# Altium PCB Sampler_DIOT.PCBDOC (part 9 of 11)
Units mm, origin at the board's own origin, x right, y up, seen from the top; angles counter-clockwise.
Board outline 222.9 x 100 mm, 4 copper layers (L1, P2, L3, L4), stack 1.6 mm thick; 754 components, 442 nets, 2347 pads, 1230 vias.
Unrouted connection lines stored in the file: 10.
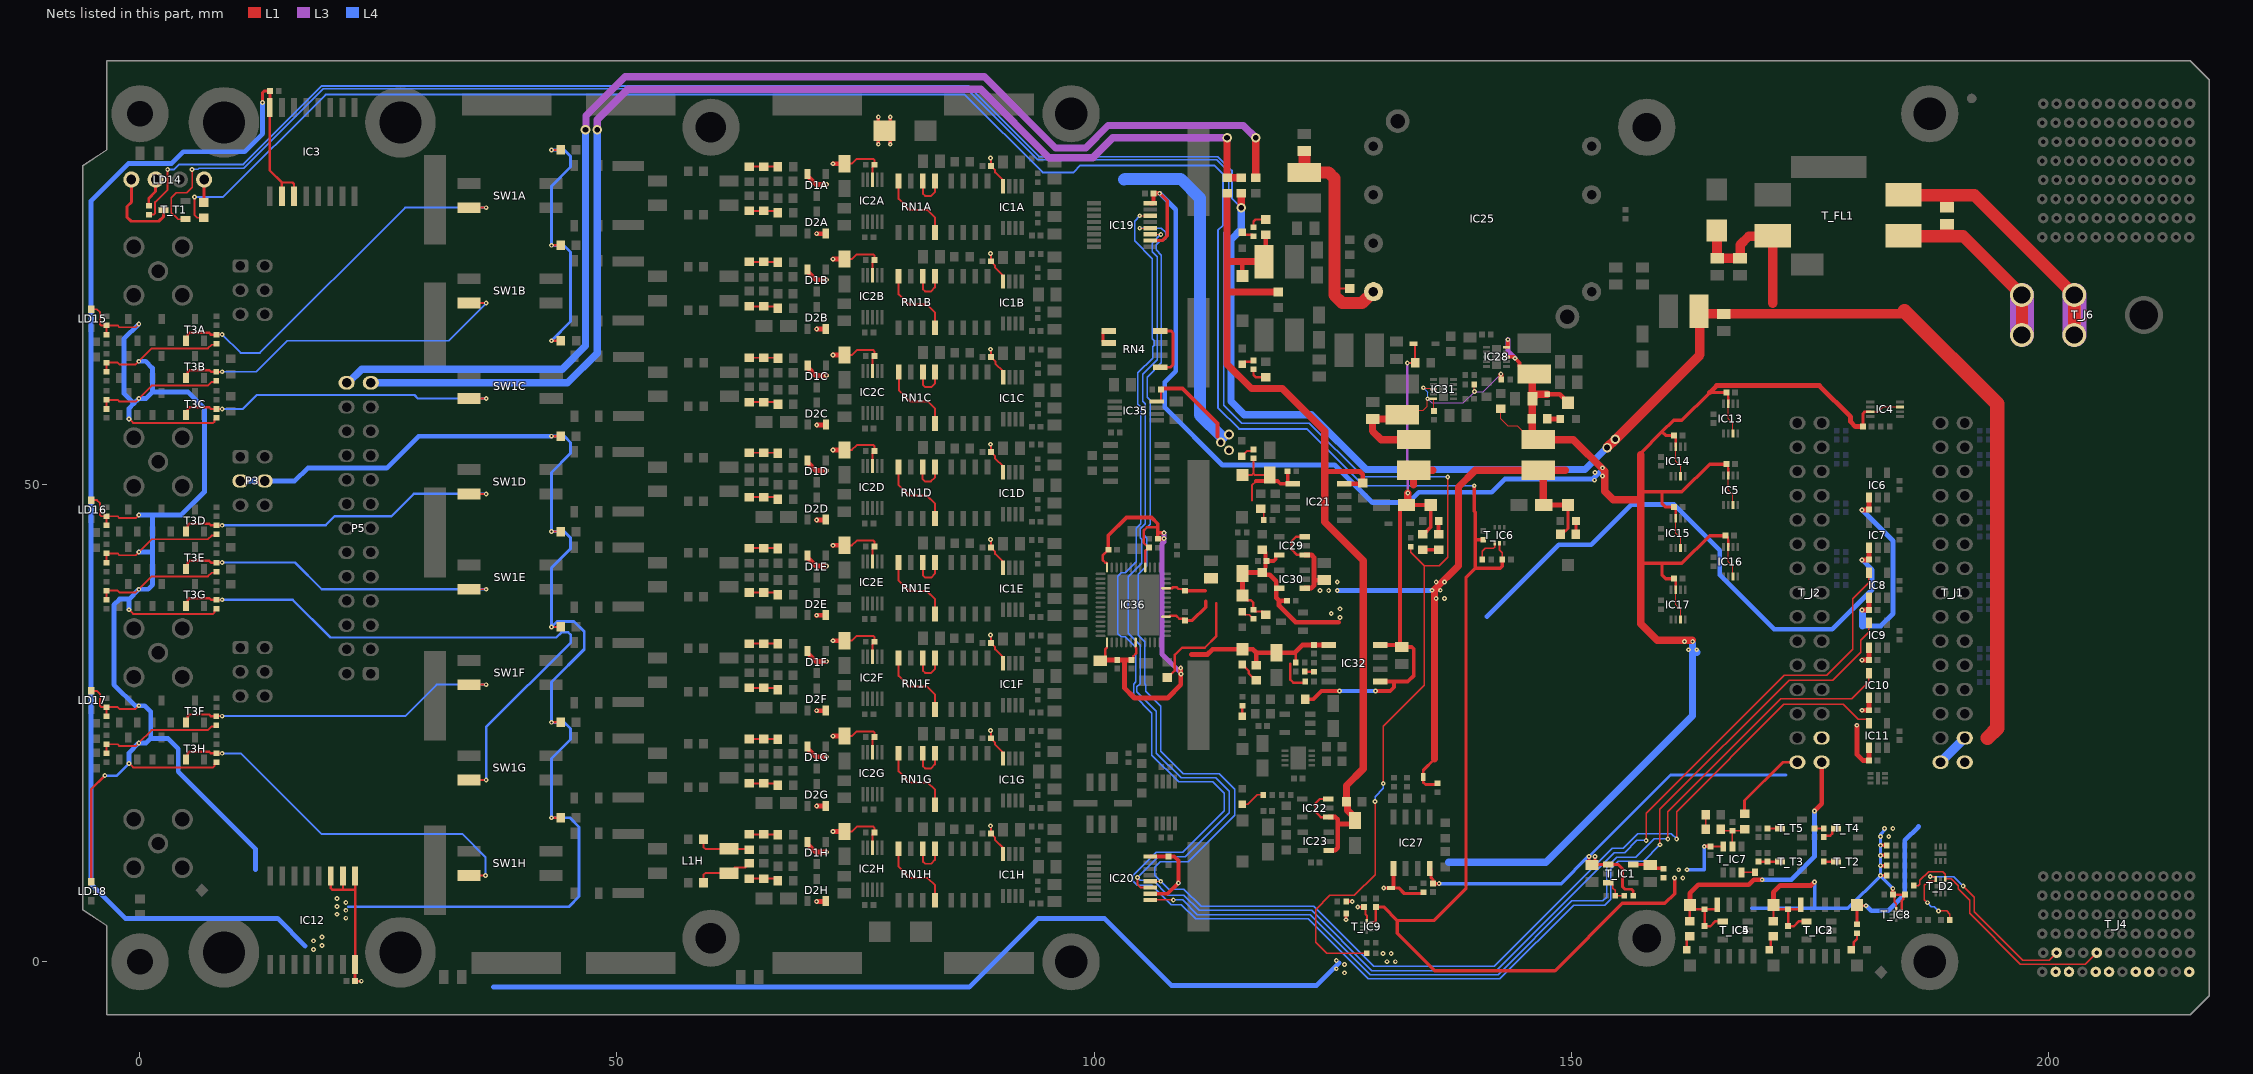
[diagram p10: the nets of this part, all layers, seen from the top]

## Via types
v1: diameter 0.5, hole 0.2, L1 to L4, tented both sides, 1208 vias
v2: diameter 1, hole 0.6, L1 to L4, tented both sides, 16 vias
v3: diameter 0.6, hole 0.3, L1 to L4, tented both sides, 6 vias

## Nets (pads, with @x,y where several pads share a name; then routed paths per layer and width w, separated by ;. In a path a pad name is that pad's centre, name@x,y a point inside that pad or via, vN(x,y) a via of type N, cw(c..) or ccw(c..) an arc to the next point about the centre after c; other vN are vias at no path point) (continued)
NetL1H_3: L1H.3 R8H.2 R9H.1 | length 6.1
  L1 w0.203: R8H.2@59.064,8.288 59.064,9.113 59.255,9.304 L1H.3@61.76,9.304 62.336,9.88 63.42,9.88 R9H.1@63.852,10.312
NetL1H_4: L1H.4 R1H.2 R2H.1 | length 5.7
  L1 w0.203: R1H.2@59.064,12.86 59.064,12.029 59.249,11.844 L1H.4@61.76,11.844 63.768,11.844 R2H.1@63.852,11.76
NetLD1_2: LD1.2 R45.1 | length 1.3
  L1 w0.25: LD1.2@115.55,76.465 115.803,76.212 116.578,76.212 R45.1@116.721,76.07
NetLD2_2: LD2.2 R47.1 | length 2
  L1 w0.25: LD2.2@179.375,1.271 179.65,1.546 179.65,2.071 179.977,2.398 R47.1@179.977,3.001
NetLD3_2: LD3.2 R48.1 | length 1.5
  L1 w0.203: LD3.2@115.5,52.975 116.086,53.561 116.561,53.561 R48.1@116.7,53.7
NetLD4_2: LD4.2 R49.1 | length 2.6
  L1 w0.152: LD4.2@115.55,16.5 116.125,16.5 117.125,17.5 R49.1@117.73,17.5
NetLD5_2: LD5.2 R50.1 | length 1.4
  L1 w0.4: R50.1@136.125,44.8 LD5.2@136.125,46.2
NetLD6_2: LD6.2 R85.1 | length 2.3
  L1 w0.25: LD6.2@115.55,31.163 116.225,30.488 116.225,30.225 116.95,29.5 R85.1@117,29.5
NetLD7_2: LD7.2 R87.1 | length 1.5
  L1 w0.5: R87.1@147.52,56.9 LD7.2@149,56.9
NetLD8_2: LD8.2 R88.1 | length 1.4
  L1 w0.3: R88.1@150.5,44.8 150.525,44.825 LD8.2@150.525,46.2
NetLD9_2: LD9.2 R89.1 | length 1.6
  L1 w0.25: LD9.2@170.775,1.271 170.928,1.423 170.928,2.378 R89.1@171.221,2.671
NetLD10_2: LD10.2 R90.1 | length 1.5
  L1 w0.25: LD10.2@162.15,1.271 162.15,2.356 R90.1@162.465,2.671
NetLD11_2: LD11.2 R91.2 | length 1.5
  L1 w0.15: LD11.2@115.55,36.7 115.875,36.375 116.255,36.375 116.68,35.95 R91.2@116.7,35.95
NetLD12_2: LD12.2 R92.1 | length 1.1
  L1 w0.254: LD12.2@115.55,25.725 R92.1@115.55,26.83
NetLD13_2: LD13.2 R93.1 | length 1.3
  L1 w0.25: LD13.2@115.55,62.635 115.803,62.888 116.578,62.888 R93.1@116.721,63.03
NetLD14_1: LD14.1 T_T1.3 | length 9
  L1 w0.3: LD14.1@-0.9,82 -0.9,79.625 -1.35,79.175 -1.35,78.052 -0.923,77.625 1.975,77.625 2.45,78.1 T_T1.3@2.45,78.807
NetLD14_2: LD14.2 T_R3.1 | length 3
  L1 w0.3: T_R3.1@0.925,79.264 0.925,80.018 1.64,80.733 LD14.2@1.64,82
NetLD14_4: LD14.4 T_R1.1 | length 2.4
  L1 w0.3: T_R1.1@6.675,79.594 6.72,79.639 LD14.4@6.72,82
NetP5_25: P5.25 R41.1 R86.1 | length 126.4
  L1 w0.762: v2(113.944,86.38) R41.1@113.944,82.18 R86.1@115.444,82.18
  L3 w0.762: v2(47.925,87.225) 47.925,88.275 51.121,91.471 88.117,91.471 95.293,84.296 99.871,84.296 101.955,86.38 v2(113.944,86.38)
  L4 w0.762: P5.25@24.2,60.69 44.815,60.69 47.925,63.8 v2(47.925,87.225)
NetP5_26: P5.26 R42.1 | length 131.4
  L1 w0.762: R42.1@116.944,82.18 v2(116.944,86.38)
  L3 w0.762: v2(46.7,87.225) 46.746,87.271 46.746,88.671 50.833,92.758 88.526,92.758 95.97,85.314 99.125,85.314 101.478,87.667 115.657,87.667 v2(116.944,86.38)
  L4 w0.762: P5.26@21.66,60.69 21.81,60.69 23.245,62.125 44.249,62.125 46.7,64.576 v2(46.7,87.225)
NetR2A_2: R2A.2 R3A.1 R4A.2 | length 3
  L1 w0.203: R2A.2@63.852,83.36 R4A.2@65.376,83.36 66.824,83.36 R3A.1@66.862,83.322
NetR2B_2: R2B.2 R3B.1 R4B.2 | length 3
  L1 w0.203: R2B.2@63.852,73.36 66.824,73.36 R3B.1@66.862,73.322
NetR2C_2: R2C.2 R3C.1 R4C.2 | length 3
  L1 w0.203: R2C.2@63.865,63.316 66.837,63.316 R3C.1@66.875,63.278
NetR2D_2: R2D.2 R3D.1 R4D.2 | length 3
  L1 w0.203: R2D.2@63.852,53.36 R4D.2@65.376,53.36 66.824,53.36 R3D.1@66.862,53.322
NetR2E_2: R2E.2 R3E.1 R4E.2 | length 3
  L1 w0.203: R2E.2@63.852,43.36 66.824,43.36 R3E.1@66.862,43.322
NetR2F_2: R2F.2 R3F.1 R4F.2 | length 3
  L1 w0.203: R2F.2@63.852,33.36 R4F.2@65.376,33.36 66.824,33.36 R3F.1@66.862,33.322
NetR2G_2: R2G.2 R3G.1 R4G.2 | length 3
  L1 w0.203: R2G.2@63.852,23.36 66.824,23.36 R3G.1@66.862,23.322
NetR2H_2: R2H.2 R3H.1 R4H.2 | length 3
  L1 w0.203: R2H.2@63.852,13.36 R4H.2@65.376,13.36 66.824,13.36 R3H.1@66.862,13.322
NetR9A_2: R9A.2 R10A.1 R11A.2 | length 3.1
  L1 w0.203: R9A.2@63.852,78.712 R11A.2@65.376,78.712 66.646,78.712 R10A.1@66.862,78.496
NetR9B_2: R9B.2 R10B.1 R11B.2 | length 3.1
  L1 w0.203: R9B.2@63.852,68.712 66.646,68.712 R10B.1@66.862,68.496
NetR9C_2: R9C.2 R10C.1 R11C.2 | length 3.1
  L1 w0.203: R9C.2@63.865,58.668 66.659,58.668 R10C.1@66.875,58.452
NetR9D_2: R9D.2 R10D.1 R11D.2 | length 3.1
  L1 w0.203: R9D.2@63.852,48.712 66.646,48.712 R10D.1@66.862,48.496
NetR9E_2: R9E.2 R10E.1 R11E.2 | length 3.1
  L1 w0.203: R9E.2@63.852,38.712 66.646,38.712 R10E.1@66.862,38.496
NetR9F_2: R9F.2 R10F.1 R11F.2 | length 3.1
  L1 w0.203: R9F.2@63.852,28.712 R11F.2@65.376,28.712 66.646,28.712 R10F.1@66.862,28.496
NetR9G_2: R9G.2 R10G.1 R11G.2 | length 3.1
  L1 w0.203: R9G.2@63.852,18.712 66.646,18.712 R10G.1@66.862,18.496
NetR9H_2: R9H.2 R10H.1 R11H.2 | length 3.1
  L1 w0.203: R9H.2@63.852,8.712 R11H.2@65.376,8.712 66.646,8.712 R10H.1@66.862,8.496
NetR31A_1: R31A.1 SW1A.2 T3A.1 | length 41
  L1 w0.203: R31A.1@8,65.745 8.606,65.745 v1(8.613,65.752) ; SW1A.2@34.486,79.05 v1@36.216,79.05 ; v1@36.216,79.015 v1@36.286,79.085
  L1 w0.25: T3A.1@4.817,65.1 5.017,65.3 5.017,65.778 5.163,65.924 7.257,65.924 7.436,65.745 R31A.1@7.997,65.745
  L4 w0.203: v1@8.61,65.749 10.541,63.817 12.567,63.817 27.8,79.05 v1@36.172,79.05
  other v1: 36.286,79.05
NetR31B_1: R31B.1 SW1B.2 T3B.1 | length 37
  L1 w0.203: R31B.1@8,61.845 8.606,61.845 v1(8.613,61.852) ; SW1B.2@34.486,69.05 v1@36.216,69.05 ; v1@36.216,69.015 v1@36.286,69.085
  L1 w0.25: T3B.1@4.82,61.2 5.02,61.4 5.02,61.878 5.166,62.024 7.26,62.024 7.439,61.845 R31B.1@7.997,61.845 R31B.1@8,61.845
  L4 w0.203: v1(8.613,61.852) 12.195,61.852 15.446,65.103 32.339,65.103 v1(36.286,69.05)
NetR31C_1: R31C.1 SW1C.2 T3C.1 | length 34.8
  L1 w0.203: R31C.1@8,57.945 8.606,57.945 v1(8.613,57.952) ; SW1C.2@34.499,59.05 v1@36.229,59.05 ; v1@36.229,59.015 v1@36.299,59.085
  L1 w0.25: T3C.1@4.825,57.3 5.025,57.5 5.025,57.978 5.171,58.124 7.265,58.124 7.444,57.945 R31C.1@8,57.945
  L4 w0.25: v1(8.613,57.952) 10.777,57.952 12.239,59.414 13.786,59.414 28.758,59.414 29.122,59.05 v1@36.295,59.05
  other v1: 36.299,59.05
NetR31D_1: R31D.1 SW1D.2 T3D.1 | length 35.4
  L1 w0.203: R31D.1@8.003,45.745 8.609,45.745 v1(8.616,45.752) ; SW1D.2@34.486,49.05 v1@36.216,49.05 ; v1@36.216,49.015 v1@36.286,49.085
  L1 w0.25: T3D.1@4.817,45.1 5.017,45.3 5.017,45.778 5.163,45.924 7.257,45.924 7.436,45.745 R31D.1@7.997,45.745
  L4 w0.25: v1@8.616,45.756 19.456,45.756 20.4,46.7 26.35,46.7 28.7,49.05 v1@36.283,49.05
  other v1: 36.286,49.05
NetR31E_1: R31E.1 SW1E.2 T3E.1 | length 35.2
  L1 w0.203: R31E.1@8,41.845 8.606,41.845 v1(8.613,41.852) ; SW1E.2@34.486,39.05 v1@36.216,39.05 ; v1@36.216,39.015 v1@36.286,39.085
  L1 w0.25: T3E.1@4.82,41.2 5.02,41.4 5.02,41.878 5.166,42.024 7.26,42.024 7.439,41.845 R31E.1@8,41.845
  L4 w0.25: v1(8.613,41.852) 16.248,41.852 19.05,39.05 v1@36.283,39.05
  other v1: 36.286,39.05
NetR31F_1: R31F.1 SW1F.2 T3F.1 | length 35.4
  L1 w0.203: R31F.1@8,25.745 8.606,25.745 v1(8.613,25.752) ; SW1F.2@34.486,29.05 v1@36.216,29.05 ; v1@36.216,29.015 v1@36.286,29.085
  L1 w0.25: T3F.1@4.817,25.1 5.017,25.3 5.017,25.778 5.163,25.924 7.257,25.924 7.436,25.745 R31F.1@7.997,25.745
  L4 w0.203: v1(8.613,25.752) 27.802,25.752 31.1,29.05 v1(36.286,29.05)
NetR31G_1: R31G.1 SW1G.2 T3G.1 | length 63.7
  L1 w0.203: R31G.1@8,37.945 8.606,37.945 v1(8.613,37.952) ; SW1G.2@34.486,19.05 v1@36.216,19.05 ; v1@36.216,19.015 v1@36.286,19.085
  L1 w0.25: T3G.1@4.825,37.3 5.025,37.5 5.025,37.978 5.171,38.124 7.265,38.124 7.444,37.945 R31G.1@8,37.945
  L4 w0.25: v1(8.613,37.952) 15.998,37.952 19.954,33.996 43.636,33.996 44.175,34.535 44.895,34.535 45.162,34.267 45.162,33.484 36.286,24.608 v1(36.286,19.05)
NetR31H_1: R31H.1 SW1H.2 T3H.1 | length 40.3
  L1 w0.203: R31H.1@8,21.845 8.606,21.845 v1(8.613,21.852) ; SW1H.2@34.486,9.05 v1(36.216,9.05)
  L1 w0.25: T3H.1@4.82,21.2 5.02,21.4 5.02,21.878 5.166,22.024 7.26,22.024 7.439,21.845 R31H.1@8,21.845
  L4 w0.203: v1(8.613,21.852) 10.571,21.852 19.017,13.406 33.778,13.406 36.216,10.969 v1(36.216,9.05)
NetR35_2: R35.2 R75.1 | length 0.9
  L1 w0.25: R35.2@122.1,30.424 R75.1@123.046,30.424
NetR45_2: R45.2 R46.1 | length 1.9
  L1 w0.25: R45.2@116.721,77.01 116.721,77.587 116.944,77.81 R46.1@118,77.81
NetR50_2: R50.2 R84.1 | length 1.6
  L1 w0.4: R84.1@134.475,43.2 R50.2@136.125,43.2
NetR93_2: R93.2 R94.1 | length 1.9
  L1 w0.25: R93.2@116.721,62.09 116.721,61.513 116.944,61.29 R94.1@118,61.29
NetRN1A_4: RN1A.4 RN1A.8 | length 8.1
  L1 w0.203: RN1A.8@79.524,81.76 79.524,79.965 80.695,78.794 82.556,78.794 83.334,78.017 RN1A.4@83.334,76.36
NetRN1A_5: RN1A.5 RN1A.6 | length 4
  L1 w0.203: RN1A.6@82.058,81.857 82.058,80.516 82.294,80.28 82.919,80.28 83.328,80.689 RN1A.5@83.328,81.857
NetRN1B_4: RN1B.4 RN1B.8 | length 8.1
  L1 w0.203: RN1B.8@79.524,71.76 79.524,69.965 80.584,68.905 82.446,68.905 83.334,68.017 RN1B.4@83.334,66.36
NetRN1B_5: RN1B.5 RN1B.6 | length 4
  L1 w0.203: RN1B.6@82.058,71.857 82.058,70.516 82.294,70.28 82.919,70.28 83.328,70.689 RN1B.5@83.328,71.857
NetRN1C_4: RN1C.4 RN1C.8 | length 8.1
  L1 w0.203: RN1C.8@79.537,61.716 79.537,59.921 80.704,58.754 82.566,58.754 83.347,57.973 RN1C.4@83.347,56.316
NetRN1C_5: RN1C.5 RN1C.6 | length 4
  L1 w0.203: RN1C.6@82.071,61.813 82.071,60.472 82.307,60.236 82.932,60.236 83.341,60.646 RN1C.5@83.341,61.813
NetRN1D_4: RN1D.4 RN1D.8 | length 8.1
  L1 w0.203: RN1D.8@79.524,51.76 79.524,49.965 80.61,48.879 82.472,48.879 83.334,48.017 RN1D.4@83.334,46.36
NetRN1D_5: RN1D.5 RN1D.6 | length 4
  L1 w0.203: RN1D.6@82.044,51.93 82.044,50.588 82.28,50.353 82.905,50.353 83.314,50.762 RN1D.5@83.314,51.93
NetRN1E_4: RN1E.4 RN1E.8 | length 8.1
  L1 w0.203: RN1E.8@79.524,41.76 79.524,39.965 80.621,38.868 82.483,38.868 83.334,38.017 RN1E.4@83.334,36.36
NetRN1E_5: RN1E.5 RN1E.6 | length 4
  L1 w0.203: RN1E.6@82.058,41.857 82.058,40.516 82.294,40.28 82.919,40.28 83.328,40.689 RN1E.5@83.328,41.857
NetRN1F_4: RN1F.4 RN1F.8 | length 8.1
  L1 w0.203: RN1F.8@79.524,31.76 79.524,29.965 80.654,28.836 82.515,28.836 83.334,28.017 RN1F.4@83.334,26.36
NetRN1F_5: RN1F.5 RN1F.6 | length 4
  L1 w0.203: RN1F.6@82.058,31.857 82.058,30.516 82.294,30.28 82.919,30.28 83.328,30.689 RN1F.5@83.328,31.857
NetRN1G_4: RN1G.4 RN1G.8 | length 8.1
  L1 w0.203: RN1G.8@79.524,21.76 79.524,19.965 80.677,18.813 82.538,18.813 83.334,18.017 RN1G.4@83.334,16.36
NetRN1G_5: RN1G.5 RN1G.6 | length 4
  L1 w0.203: RN1G.6@82.058,21.857 82.058,20.516 82.294,20.28 82.919,20.28 83.328,20.689 RN1G.5@83.328,21.857
NetRN1H_4: RN1H.4 RN1H.8 | length 8.1
  L1 w0.203: RN1H.8@79.524,11.76 79.524,9.965 80.725,8.764 82.586,8.764 83.334,8.017 RN1H.4@83.334,6.36
NetRN1H_5: RN1H.5 RN1H.6 | length 4
  L1 w0.203: RN1H.6@82.058,11.857 82.058,10.516 82.294,10.28 82.919,10.28 83.328,10.689 RN1H.5@83.328,11.857
NetRN4_1: RN4.1 RN4.2 | length 2.3
  L1 w0.3: RN4.2@101.55,64.86 101.08,64.86 100.93,65.01 100.93,65.98 101.08,66.13 RN4.1@101.55,66.13
NetRN4_5: RN4.5 RN4.8 | length 6.2
  L1 w0.3: RN4.5@106.95,62.32 108.032,62.32 108.292,62.58 108.292,65.928 108.09,66.13 RN4.8@106.95,66.13
NetT_C2_2: T_C2.2 T_IC1.5 T_R2.1 | length 3.3
  L1 w0.35: T_IC1.5@156.525,10.2 T_C2.2@158.3,10.2 ; T_C2.2@158.3,10.15 158.637,9.813 159.635,9.813 T_R2.1@159.7,9.747
NetT_C11_1: T_C11.1 T_FL1.3 T_J6.1 T_J6.2 | length 31.5
  L1 w1.27: T_FL1.3@184.875,80.35 189.324,80.35 ; 189.4,80.35 192.3,80.35 T_J6.1@202.75,69.9 T_J6.2@202.75,65.7
  L1 w1.4: T_C11.1@189.4,79.3 189.4,80.274
  L3 w2.5: T_J6.2@202.782,65.694 T_J6.1@202.782,69.894
NetT_C11_2: T_C11.2 T_FL1.1 T_J6.3 T_J6.4 | length 24.2
  L1 w1.27: T_FL1.1@184.875,76.05 189.333,76.05 ; 189.4,76.05 191.1,76.05 T_J6.3@197.25,69.9 ; T_J6.4@197.282,65.694 T_J6.3@197.282,69.894
  L1 w1.4: 189.4,76.117 T_C11.2@189.4,77.1
  L3 w2.5: T_J6.4@197.282,65.694 T_J6.3@197.282,69.894
NetT_C13_1: T_C13.1 T_IC7.5 T_R29.1 T_R30.2 | length 4.3
  L1 w0.152: T_R30.2@165.707,13.9 165.871,13.736 T_C13.1@166.919,13.736 ; T_IC7.5@166.919,12.086 T_C13.1@166.919,13.736 ; T_R29.1@168.2,13.9 168.036,13.736 T_C13.1@166.919,13.736
NetT_C14_1: T_C14.1 T_C21.2 | length 1
  L1 w0.25: T_C14.1@175.542,13.977 T_C21.2@176.493,13.977
NetT_C15_1: T_C15.1 T_T5.3 | length 1.3
  L1 w0.254: T_C15.1@170.609,13.977 T_T5.3@171.916,13.977
NetT_C17_1: T_C17.1 T_T2.3 | length 1.3
  L1 w0.25: T_C17.1@176.493,10.5 T_T2.3@177.8,10.5
NetT_C18_1: T_C18.1 T_C19.1 T_T3.3 | length 2.3
  L1 w0.25: T_C18.1@169.658,10.5 T_C19.1@170.609,10.5 T_T3.3@171.916,10.5
NetT_C21_1: T_C21.1 T_T4.3 | length 1.9
  L1 w0.25: T_C21.1@176.493,13.077 176.641,13.225 177.175,13.225 177.4,13.45 177.4,13.777 177.6,13.977 T_T4.3@177.8,13.977
NetT_D2_4: T_D2.4 T_J4.H2 T_R15.2 | length 25.8
  L1 w0.152: T_R15.2@185.942,7.99 186.419,7.99 186.576,8.148 186.576,8.542 187.488,9.454 188.966,9.454 189.231,9.189 T_D2.4@189.231,8.693 189.858,8.693 190.6,7.951 190.6,7.649 191.797,6.452 191.797,5.07 197.108,-0.241 203.91,-0.241 T_J4.H2@205.1,0.95
NetT_D2_6: T_D2.6 T_J4.K2 T_R17.2 | length 25.3
  L1 w0.152: v1(187.375,6.2) 187.05,6.525 187.05,8.031 187.482,8.463 T_D2.6@188.157,8.463 ; v1(187.654,8.932) T_D2.6@188.26,8.932 ; v1(188.507,5.332) 189.368,5.332 189.72,4.98 T_R17.2@189.72,4.4 ; v1(191.105,7.933) 192.262,6.777 192.262,5.263 197.362,0.162 200.112,0.162 T_J4.K2@200.855,0.905
  L4 w0.152: v1(187.375,6.2) 187.786,5.789 188.049,5.789 v1(188.507,5.332) ; v1(187.654,8.932) 190.107,8.932 v1(191.105,7.933)
NetT_D6_2: T_D6.2 T_IC7.3 | length 1.4
  L1 w0.152: T_IC7.3@167.869,9.386 167.874,9.391 T_D6.2@169.276,9.391
NetT_IC1_3: T_IC1.3 T_R4.2 T_R7.2 | length 2.9
  L1 w0.152: T_IC1.3@153.925,8.3 154.175,8.3 154.399,8.076 154.399,7.701 154.62,7.48 T_R7.2@154.62,6.925 T_R4.2@155.68,6.925
NetT_IC6_4: T_IC6.4 T_R25.2 | length 2.7
  L1 w0.152: T_R25.2@140.698,42.184 140.698,43.023 141,43.325 141.85,43.325 142,43.475 T_IC6.4@142,43.862
NetT_R9_2: T_R9.2 T_R30.1 | length 1.5
  L1 w0.152: T_R30.1@164.106,13.9 T_R9.2@164.107,15.4
P2V5A: C16.2 C71.2 C75.2 C76.2 C77.1 C92.2 C93.2 C94.2 IC7.1 IC29.5 IC30.5 IC36.31 IC36.37 R70.2 R76.1 R77.1 R91.1 TP10.1 | length 106.4
  L1 w0.25: R77.1@107.694,29.805 107.744,29.805 108.468,30.529 108.468,32.168 109.225,32.925 111.601,32.925 112.825,34.149 112.825,37.6 ; TP10.1@115.55,38.406 116.06,37.896 116.454,37.896 116.7,37.65 R91.1@116.7,36.89 116.865,36.725 117.026,36.725 117.031,36.72 117.68,36.72 R76.1@118,36.4
  L1 w0.254: IC36.31@107.539,36.165 107.894,36.165 107.99,36.261 108.633,36.261 108.938,35.956 C92.2@109.48,35.956 ; IC36.37@107.539,39.165 108.18,39.165 108.26,39.246 108.678,39.246 108.845,39.079 109.195,39.079 C93.2@109.378,38.896 ; C94.2@111.829,39.807 C94.2@112.252,40.23
  L1 w0.35: C92.2@109.534,35.782 110.307,35.782 111.7,37.175 111.7,37.8 ; C93.2@109.534,38.896 111.654,38.896
  L1 w0.4: C71.2@117.65,40.8 117.675,40.8 117.95,41.075 117.95,41.27 117.99,41.309 117.99,41.656 ; R70.2@117.65,43.2 117.7,43.2 117.99,42.91 117.99,42.11 C76.2@118.1,42 ; 117.99,41.656 117.99,41.89 C76.2@118.1,42 ; IC29.5@119.4,42.65 119.125,42.65 119.05,42.575 119.05,42.234 118.816,42 C76.2@118.1,42
  L1 w0.508: TP10.1@115.55,38.406 C77.1@115.55,40.7 115.65,40.8 C71.2@117.65,40.8 117.871,40.579 118.417,40.579 119.104,39.892 119.104,39.171 119.125,39.15 IC30.5@119.143,39.15 ; IC30.5@119.104,39.129 119.104,38.148 119.402,37.85 ; IC30.5@119.122,39.129 IC30.5@119.143,39.15 ; IC30.5@119.4,39.15 IC30.5@119.143,39.15 ; C75.2@120.25,37.85 119.402,37.85 ; 125.65,35.6 121.125,35.6 119.402,37.323 119.402,37.85 ; v1(180.502,42.12) 181.227,42.12 IC7.1@181.227,43.42
  L4 w0.5: 141.188,36.188 148.721,43.721 152.121,43.721 156.325,47.925 160.825,47.925 165.6,43.15 165.6,40.55 171.285,34.865 177.39,34.865 181.55,39.025 181.55,41.072 v1(180.502,42.12)
  other v1: 125.775,36.1 124.865,36.515 125.775,37
P3V3: C15.2 C17.2 C18.2 C19.2 C20.2 C21.2 C22.2 C23.2 C24.2 C25.2 C27.2 C28.2 C30.2 C31.2 C32.2 C33.2 C69.2 C70.2 D9.1 IC3.2 IC3.3 IC3.16 IC4.3 IC4.7 IC5.3 IC5.7 IC6.1 IC8.1 IC9.1 IC10.1 IC11.1 IC12.1 IC12.2 IC12.3 IC12.16 IC13.3 IC13.7 IC14.3 IC14.7 IC15.3 IC15.7 IC16.3 IC16.7 IC17.3 IC17.7 IC19.10 IC19.16 IC20.10 IC20.16 IC27.5 IC28.8 IC28.10 L7.2 L8.1 LD15.2 LD16.2 LD17.2 LD18.2 P3.3 P3.4 R25A.2 R25B.2 R25C.2 R25D.2 R25E.2 R25F.2 R25G.2 R25H.2 R27A.2 R27B.2 R27C.2 R27D.2 R27E.2 R27F.2 R27G.2 R27H.2 R29A.2 R29B.2 R29C.2 R29D.2 R29E.2 R29F.2 R29G.2 R29H.2 R31A.2 R31B.2 R31C.2 R31D.2 R31E.2 R31F.2 R31G.2 R31H.2 R65.2 R66.2 R87.2 T_C25.2 T_IC9.1 T_R67.2 T_R68.2 TP17.1 | length 963.1
  L1 w0.127: IC20.16@105.899,11.037 IC20.16@105.944,11.082 ; C33.2@107.787,11.037 C33.2@107.8,11.05 ; R66.2@143.077,57.583 142.691,57.97 R66.2@142.641,57.97 142.641,56.909 143.345,56.205 144.344,56.205 145.821,54.729 146.567,54.729 L8.1@146.571,54.729 ; IC15.7@160.973,46.49 IC15.7@160.977,46.494 160.977,44.944 161.477,44.444 IC15.3@161.477,43.394 ; IC17.7@160.977,38.995 160.977,37.444 161.477,36.944 IC17.3@161.477,35.895 ; IC14.7@160.978,53.994 160.978,52.444 161.478,51.944 IC14.3@161.478,50.894 ; IC16.7@166.478,43.495 166.478,41.944 166.978,41.444 IC16.3@166.978,40.395 ; IC5.7@166.478,50.994 166.478,49.444 166.978,48.944 IC5.3@166.978,47.894 ; IC13.7@166.478,58.494 166.478,56.944 166.978,56.444 IC13.3@166.978,55.394 ; IC4.7@181.367,57.664 182.218,57.664 182.718,58.164 IC4.3@184.467,58.164
  L1 w0.203: LD17.2@-5.1,28.4 -4.514,28.4 -4.183,28.069 -4.183,26.824 -4.064,26.705 R27F.2@-3.5,26.705 ; LD16.2@-5.1,48.4 -4.514,48.4 -4.183,48.069 -4.183,46.824 -4.064,46.705 R27D.2@-3.5,46.705 ; LD15.2@-5.1,68.4 -4.514,68.4 -4.183,68.069 -4.183,66.824 -4.064,66.705 R27A.2@-3.5,66.705 ; R29H.2@-3.5,21.845 -3.5,22.805 R27H.2@-3.497,22.805 -2.335,22.805 -2.148,22.617 -0.447,22.617 v1(-0.119,22.945) 1.23,24.294 7.117,24.294 7.501,24.679 7.871,24.679 R31F.2@7.997,24.805 ; R29F.2@-3.5,25.745 R27F.2@-3.5,26.705 ; R29G.2@-3.5,37.945 R27G.2@-3.5,38.905 -2.338,38.905 -2.151,38.717 -0.45,38.717 v1(-0.122,39.045) 1.227,40.394 7.12,40.394 7.504,40.779 7.874,40.779 R31E.2@8,40.905 ; R29E.2@-3.5,41.845 R27E.2@-3.5,42.805 -2.338,42.805 -2.151,42.617 -0.45,42.617 v1(-0.122,42.945) 1.227,44.294 7.12,44.294 7.504,44.679 7.874,44.679 R31D.2@8,44.805 R31D.2@8.004,44.809 ; R29D.2@-3.5,45.745 R27D.2@-3.5,46.705 ; R29C.2@-3.5,57.945 -3.5,58.905 R27C.2@-3.497,58.905 -2.335,58.905 -2.148,58.717 -0.447,58.717 v1(-0.119,59.045) 1.23,60.394 7.117,60.394 7.501,60.779 7.871,60.779 R31B.2@7.997,60.905 ; R29B.2@-3.5,61.845 R27B.2@-3.5,62.805 -2.338,62.805 -2.151,62.617 -0.45,62.617 v1(-0.122,62.945) 1.227,64.294 7.12,64.294 7.504,64.679 7.874,64.679 R31A.2@8,64.805 ; R29A.2@-3.5,65.745 R27A.2@-3.5,66.705 ; v1@-1.15,20.8 -0.731,20.381 7.673,20.381 7.792,20.5 7.792,20.717 7.98,20.905 R31H.2@8,20.905 ; v1@-1.15,36.9 -0.731,36.481 7.673,36.481 7.792,36.6 7.792,36.817 7.98,37.005 R31G.2@8,37.005 ; v1@-1.15,56.9 -0.731,56.481 7.673,56.481 7.792,56.6 7.792,56.817 7.98,57.005 R31C.2@8,57.005 ; v1(-0.122,26.845) -0.45,26.517 -2.151,26.517 -2.338,26.705 R27F.2@-3.5,26.705 ; v1(-0.122,46.845) -0.45,46.517 -2.151,46.517 -2.338,46.705 R27D.2@-3.5,46.705 ; v1(-0.122,66.845) -0.45,66.517 -2.151,66.517 -2.338,66.705 R27A.2@-3.5,66.705 ; v1@23.194,-2.027 v1@23.201,-2.034
  L1 w0.22: T_C25.2@128.477,5.57 128.477,4.979 128.6,4.855 T_IC9.1@128.6,4.23
  L1 w0.25: LD18.2@-5.1,8.4 -5.1,18.107 v1(-3.684,19.523) ; IC3.16@13.605,89.55 13.605,82.963 14.875,81.693 ; IC3.2@14.875,80.25 14.875,81.693 ; IC3.3@16.145,80.25 16.145,81.546 15.999,81.693 14.875,81.693 ; IC12.3@20.005,9 20.005,7.704 20.151,7.557 21.275,7.557 ; IC12.2@21.275,9 21.275,7.557 ; IC12.16@22.545,-0.3 22.545,7.557 ; IC12.1@22.72,9.7 22.545,9.525 IC12.1@22.545,9 22.545,7.557 ; v1(43.123,15.1) R25H.2@44.1,15.1 ; v1(43.123,25.1) R25G.2@44.1,25.1 ; v1(43.123,35.1) R25F.2@44.1,35.1 ; v1(43.123,45.1) R25E.2@44.1,45.1 ; v1(43.123,55.1) R25D.2@44.1,55.1 ; v1(43.123,75.1) R25B.2@44.1,75.1 ; v1(43.123,85.1) R25A.2@44.1,85.1 ; v1(43.136,65.1) R25C.2@44.113,65.1 ; T_C25.2@128.3,5.746 T_C25.2@128.477,5.57 ; C30.2@160.777,40.17 160.958,39.989 160.958,39.723 160.977,39.704 IC17.7@160.977,38.995 ; C27.2@160.777,47.669 160.958,47.488 160.958,47.223 160.977,47.204 IC15.7@160.977,46.494 ; C25.2@160.778,55.169 160.958,54.988 160.958,54.723 160.978,54.703 IC14.7@160.978,53.994 ; C28.2@166.278,44.67 166.459,44.489 166.459,44.223 166.478,44.204 IC16.7@166.478,43.495 ; C18.2@166.278,52.169 166.459,51.989 166.459,51.723 166.478,51.704 IC5.7@166.478,50.994 ; C24.2@166.278,59.669 166.459,59.488 166.459,59.223 166.478,59.204 IC13.7@166.478,58.494 ; 21.275,7.557 22.545,7.557
  L1 w0.3: v1(12.85,90.075) 12.85,91.092 13.026,91.268 C15.2@13.643,91.268 13.624,91.249 13.624,89.569 IC3.16@13.605,89.55 ; IC12.16@22.545,-0.3 22.541,-0.304 22.541,-2.027 C31.2@22.538,-2.031 v1@23.194,-2.031 ; C17.2@180.6,56.1 180.6,57.475 180.789,57.664 IC4.7@181.367,57.664
  L1 w0.35: IC19.10@105.899,75.6 107.179,75.6 107.675,76.096 107.675,79.76 v1(106.882,80.554) ; v1(126.42,4.41) T_R68.2@126.42,5.061 ; T_R67.2@126.42,6.331 v1(127.071,6.331) ; v1(127.649,5.746) T_C25.2@128.3,5.746 ; v1(130.374,7.742) D9.1@131.025,7.742 ; D9.1@131.146,7.742 131.336,7.742 131.933,7.742 132.514,7.161 134.426,7.161 R65.2@134.536,7.272 ; 157.3,49.275 159.536,49.275 ; 157.3,53.328 159.536,55.564 ; 157.445,41.775 159.536,41.775 ; C30.2@160.777,40.17 159.93,40.17 159.536,40.564 159.536,41.775 ; C27.2@160.777,47.669 159.931,47.669 159.536,48.064 159.536,49.275 ; C25.2@160.778,55.169 159.931,55.169 159.536,55.564 ; C28.2@166.278,44.67 164.52,44.67 161.625,41.775 159.536,41.775 ; C18.2@166.278,52.169 164.52,52.169 161.625,49.275 159.536,49.275 ; C24.2@166.278,59.669 164.52,59.669 161.625,56.774 160.746,56.774 159.536,55.564
  L1 w0.381: IC28.8@143.242,63.415 143.996,63.415 v1@144.115,63.295 ; IC28.10@143.242,64.415 143.378,64.55 v1(143.378,65.215) ; v1(144.141,63.27) 144.606,62.804 144.606,62.444 145.415,61.635 L7.2@146.165,61.635
  L1 w0.4: IC20.10@105.899,7.137 107.721,7.137 v1(108.842,8.258) 108.842,10.608 108.413,11.037 107.787,11.037 IC20.16@105.899,11.037 ; IC19.16@105.899,79.5 106.227,79.5 106.252,79.525 C32.2@106.252,80.554 ; D9.1@131.336,7.742 131.381,7.787 IC27.5@131.381,9.792
  L1 w0.5: C69.2@147.532,59.494 148.804,59.494 TP17.1@149.7,58.597 ; 164.52,59.669 165.251,60.4 176.043,60.4 179.3,57.143 179.3,56.6 179.8,56.1 C17.2@180.6,56.1
  L1 w0.508: C32.2@106.402,80.554 v1(106.882,80.554) ; v1(179.959,24.792) 179.959,21.746 180.586,21.12 C23.2@181.227,21.12 IC11.1@181.227,22.42 ; v1(180.502,26.37) C22.2@181.227,26.37 IC10.1@181.227,27.67 ; v1(180.502,31.62) C21.2@181.227,31.62 IC9.1@181.227,32.92 ; v1(180.502,36.87) 181.227,36.87 C20.2@181.227,36.895 IC8.1@181.227,38.17 ; v1(180.502,47.37) 181.227,47.37 C19.2@181.227,47.395 IC6.1@181.227,48.67
  L1 w0.762: L7.2@146.165,61.635 145.948,61.417 C70.2@145.948,59.018 ; L8.1@146.567,54.729 145.948,55.348 C70.2@145.948,59.018 ; L8.1@146.571,54.729 150.246,54.729 153.525,51.45 153.525,49.325 154.425,48.425 157.3,48.425 ; C69.2@147.512,59.494 146.423,59.494 C70.2@145.948,59.018 ; 157.3,53.167 157.3,49.275 157.3,48.425 ; v1@162.718,33.7 159.05,33.7 157.3,35.45 157.3,48.425
  L3 w0.508: v1(143.378,65.215) 143.378,64.032 v1@144.133,63.277
  L4 w0.25: v1(-3.684,19.523) -2.42,19.523 v1(-1.143,20.8) ; -1.214,21.993 -0.31,22.897 -0.167,22.897 v1(-0.119,22.945)
  L4 w0.3: 21.875,5.775 44.96,5.775 46.025,6.84 46.025,14.144 45.069,15.1 v1(43.123,15.1) 43.123,21.298 45.13,23.305 45.13,24.445 44.475,25.1 v1(43.123,25.1) 43.123,29.314 46.571,32.763 46.571,34.624 45.509,35.686 43.71,35.686 v1(43.123,35.1) 43.123,41.298 45.13,43.305 45.13,44.445 44.475,45.1 v1(43.123,45.1) 43.123,51.298 45.13,53.305 45.13,54.445 44.475,55.1 v1(43.123,55.1) ; v1(43.123,85.1) 44.475,85.1 45.13,84.445 45.13,83.305 43.123,81.298 v1(43.123,75.1) 44.438,75.1 45.142,74.396 45.142,67.106 v1(43.136,65.1)
  L4 w0.35: v1@108.9,8.3 v1@108.948,8.252
  L4 w0.5: v1@-1.146,36.9 -1.146,38.022 ; v1(-1.143,20.8) -1.143,21.922 v1@-0.167,22.897 ; v1(-1.143,56.9) -1.143,58.022 -0.631,58.533 ; v1(-0.122,42.945) 1.252,42.945 1.32,42.878 ; v1(-0.122,46.845) 1.119,46.845 ; v1(-0.122,62.945) 0.593,62.945 1.3,62.238 1.3,59.725 ; v1(-0.122,66.845) -1.681,65.287 -1.681,59.583 -0.631,58.533 ; v1(-0.119,22.945) 0.65,22.945 1.125,23.42 ; P3.3@10.53,50.4 P3.4@13.07,50.4 16.225,50.4 17.575,51.75 25.85,51.75 29.2,55.1 v1(43.123,55.1) ; 12.104,9.678 12.104,11.849 4.02,19.933 4.02,22.332 2.931,23.42 1.125,23.42 ; v1(12.85,90.075) 12.85,86.793 10.96,84.903 4.544,84.903 3.327,83.686 -1.196,83.686 -5.123,79.759 -5.123,8.123 -1.55,4.55 14.425,4.55 17.325,1.65 ; 37.023,-2.647 86.933,-2.647 94.11,4.53 101.12,4.53 108.135,-2.485 123.315,-2.485 125.7,-0.1 ; -1.146,38.022 -2.143,38.022 -2.725,37.439 -2.725,29.05 -0.52,26.845 v1(-0.122,26.845) 0.511,26.845 1.125,26.231 1.125,23.42 ; -1.146,38.022 v1(-0.122,39.045) 0.845,39.045 1.32,39.52 1.32,42.878 ; -0.631,58.533 v1(-0.119,59.045) 0.62,59.045 1.3,59.725 ; 1.119,46.845 4.349,46.845 6.75,49.246 6.75,58.015 5.04,59.725 1.3,59.725 ; 1.119,46.845 1.32,46.645 1.32,42.878
  L4 w0.508: v1(106.882,80.554) 108.575,78.86 108.575,61.925 107.411,60.761 107.411,58.114 113.45,52.075 125.23,52.075 129.162,48.143 132.958,48.143 134.042,49.227 141.677,49.227 143.05,50.6 152.25,50.6 153.2,51.55 ; v1(180.502,47.37) 183.75,44.122 183.75,36.478 182.488,35.216 180.55,35.216
  L4 w0.762: 137.15,10.45 147.375,10.45 162.725,25.8 162.725,32.447 ; v1@162.725,33.575 162.725,32.447 ; 163.181,32.447 162.725,32.447 ; 180.55,35.216 v1@180.55,36.7
  other v1: 23.201,-2.031 126.262,-1.156 125.4,-0.725 126.262,-0.294 130.719,0.013 131.581,0.013 125.4,0.137 130.288,0.875 131.15,0.875 18.175,1.3 19.085,1.715 18.175,2.2 19.085,2.615 21.575,4.575 20.665,4.99 21.575,5.396 20.665,5.81 21.575,6.225 20.665,6.64 162.319,32.713 163.181,32.713 161.888,33.575 162.75,33.575 -1.143,36.9 152.45,50.488 153.312,50.919 152.5,51.3 153.312,51.781
P3V3_MP: R89.2 T_C3.2 T_C4.2 T_C8.2 T_C20.2 T_C22.2 T_C23.2 T_C24.2 T_IC2.4 T_IC3.8 T_IC6.5 T_IC7.6 T_IC8.1 T_IC8.8 T_IC9.8 T_J1.30 T_R1.2 T_R2.2 T_R8.2 T_R31.2 T_R32.2 T_R33.2 T_R34.2 TP18.1 | length 328.4
  L1 w0.152: T_J1.30@191.12,20.92 T_J1.30@191.27,20.92
  L1 w0.2: v1(5.725,80.171) 5.725,78.25 5.981,77.994 T_R1.2@6.675,77.994 ; T_IC6.5@142.5,43.862 142.5,43.175 142.79,42.885 T_C8.2@142.79,42.184 ; T_C22.2@183.9,6.873 183.9,6.271 184.091,6.08 T_IC8.1@184.091,5.488
  L1 w0.25: T_IC9.8@129.075,4.1 129.353,4.1 129.537,4.284 T_C24.2@129.537,5.734
  L1 w0.254: T_C20.2@164.62,12.086 T_IC7.6@165.969,12.086 ; R89.2@171.221,4.249 TP18.1@171.221,5.72 ; TP18.1@171.304,5.72 171.511,5.513 T_C4.2@172.753,5.513 ; T_IC3.8@174.078,5.984 174.078,5.686 173.905,5.513 T_C4.2@172.753,5.513 ; T_C22.2@183.9,6.873 T_C22.2@183.73,7.042 T_C23.2@185,7.042 184.827,6.869 184.827,6.565 184.665,6.403 T_IC8.8@184.665,5.373 ; T_C4.2@172.753,5.513 T_C3.2@172.753,3.734 173.361,3.734 173.861,4.234 ; 173.861,4.234 T_IC2.4@174.683,4.234 173.861,4.234
  L1 w0.35: T_C24.2@129.55,5.746 130.379,5.746 131.8,4.325 ; v1(139.857,49.898) 139.857,47.225 139.945,47.137 139.945,44.193 ; T_R8.2@140.8,44.23 139.982,44.23 139.945,44.193 ; T_C8.2@142.79,42.184 142.79,41.454 142.585,41.249 139.945,41.249 ; v1(160.857,8.793) 160.857,7.132 159.85,6.125 155.375,6.125 148.325,-0.925 135.72,-0.925 131.8,2.995 131.8,4.325 ; v1(163.969,12.096) T_C20.2@164.62,12.096 ; v1(182.441,9.044) T_R31.2@183.092,9.044 ; v1(182.441,10.078) T_R32.2@183.092,10.078 ; v1(182.441,11.153) T_R33.2@183.092,11.153 ; v1(182.441,12.207) T_R34.2@183.092,12.207 ; T_C22.2@183.73,7.042 183.73,7.688 v1(183.732,7.691) ; 131.8,4.325 135.629,4.325 139,7.696 139,40.304 139.945,41.249 ; 139.945,41.249 139.945,44.193
  L1 w0.5: TP18.1@171.221,5.803 TP18.1@171.221,5.949 171.221,7.3 171.929,8.008 175.171,8.008 v1(175.531,8.368)
  L4 w0.2: v1(5.725,80.171) 8.718,80.171 19.448,90.9 86.453,90.9 94.606,82.747 97.857,82.747 98.58,83.47 112.602,83.47 113.529,82.543 113.529,77.204 112.986,76.661 112.986,58.08 115.214,55.852 122.319,55.852 128.273,49.898 v1(139.857,49.898)
  L4 w0.35: v1(162.15,9.655) 163.969,9.655 v1(163.969,12.096) ; 168.95,5.6 175.531,5.6 ; v1(175.531,8.368) 175.531,5.6 ; v1@182.95,13.9 182.441,13.391 v1(182.441,13.125) v1(182.441,12.207) v1(182.441,11.153) v1(182.441,10.078) v1(182.441,9.044) ; v1(183.732,7.691) 182.441,8.982 v1(182.441,9.044) ; 175.531,5.6 178.997,5.6 v1(182.441,9.044)
  other v1: 161.719,8.793 161.288,9.655 183.303,13.125 182.872,13.987 183.735,13.987
P3V3_MP2: R90.2 T_C5.2 T_C6.2 T_IC4.4 T_IC5.8 T_J2.30 TP19.1 | length 35.3
  L1 w0.254: R90.2@162.465,4.249 TP19.1@162.465,5.72 ; TP19.1@162.755,5.513 T_C6.2@163.997,5.513 ; T_IC5.8@165.323,5.984 165.323,5.686 165.15,5.513 T_C6.2@163.997,5.513 ; T_C6.2@163.997,5.513 T_C5.2@163.997,3.734 164.605,3.734 165.105,4.234 ; 165.105,4.234 T_IC4.4@165.928,4.234 165.105,4.234
  L1 w0.5: TP19.1@162.465,5.874 162.465,7.19 163.348,8.073 168.623,8.073 169.151,8.601 v1(170.034,8.601) ; v1(175.514,15.805) 176.27,16.561 T_J2.30@176.27,20.92
  L4 w0.5: v1(170.034,8.601) 173.101,8.601 175.514,11.014 v1(175.514,15.805)
P3V3A: C67.1 C68.2 D7.1 IC29.1 IC29.3 IC30.1 L8.2 R60.2 R88.2 TP11.1 | length 76.4
  L1 w0.25: IC29.1@122.1,42.65 121.275,42.65 120.72,43.204 120.72,44.095 121.175,44.55 IC29.3@122.1,44.55
  L1 w0.3: 135.698,21.273 134.511,20.086 D7.1@134.511,19.382 134.511,18.802 134.741,18.573 135.873,18.573 R60.2@136.011,18.712 ; R88.2@148.9,44.8 148.9,44.85 149.2,45.15 149.438,45.15 149.7,45.412 TP11.1@149.7,47.88
  L1 w0.5: IC30.1@122.1,39.15 122.125,39.175 122.782,39.175 123.05,39.443 123.05,40 ; IC29.1@122.1,42.65 122.8,42.65 123.05,42.4 123.05,40 ; C68.2@124.15,40 123.05,40 ; C67.1@147.15,47.88 TP11.1@149.7,47.88
  L1 w0.762: 135.698,21.273 135.698,39.023 138.2,41.525 138.2,49.761 139.968,51.529 L8.2@146.571,51.529 ; C67.1@147.1,48.15 147.1,50.999 L8.2@146.571,51.529 ; 149.42,51.529 L8.2@146.571,51.529
  L4 w0.5: v1(125.5,38.915) 128.1,38.915 135.89,38.915 ; 132.39,38.915 132.4,38.925
  other v1: 135.869,38.088 136.731,38.088 123.7,38.915 124.6,38.915 135.438,38.95 136.3,38.95 125.5,39.815 135.869,39.812 136.731,39.812
P5V0A: C82.1 C83.2 C84.1 C87.2 C88.2 C89.2 C90.2 C91.2 IC32.1 IC36.15 IC36.21 IC36.44 IC36.52 R73.2 R78.2 R85.2 TP13.1 | length 74.7
  L1 w0.25: 120.589,31.275 120.589,29.561 120.9,29.25 122.007,29.25 C82.1@122.146,29.389 ; 121.05,32.4 121.16,32.29 R73.2@121.16,31.364 R73.2@121.118,31.406
  L1 w0.254: C91.2@100.823,31.604 100.871,31.652 101.2,31.98 101.2,32.775 101.364,32.939 IC36.15@101.364,33.49 ; IC36.52@101.364,41.34 101.364,41.736 101.274,41.826 101.183,41.826 100.938,42.07 100.938,42.635 C90.2@101.5,43.197 ; C87.2@103.932,31.65 104.115,31.833 104.115,32.025 104.444,32.354 104.444,32.867 104.364,32.948 IC36.21@104.364,33.49 ; IC36.44@105.364,41.34 105.364,43.052 C89.2@105.719,43.407 ; C89.2@105.758,43.447 C89.2@105.719,43.407 ; 106.687,45.55 105.522,45.55 105.194,45.223 105.194,43.932 C89.2@105.719,43.407
  L1 w0.35: 106.677,44.969 106.687,44.969 v1(107.329,44.969) ; R78.2@106.687,44.361 v1(107.338,44.361)
  L1 w0.4: C90.2@101.5,43.197 101.5,44.675 103.4,46.575 106.025,46.575 106.687,45.913 106.687,45.55 106.687,44.969 R78.2@106.687,44.361
  L1 w0.508: C91.2@100.655,31.557 100.75,31.652 100.871,31.652 C88.2@102.432,31.652 ; C88.2@102.433,31.65 103.183,31.65 ; C87.2@103.932,31.65 103.183,31.65 ; v1(109.097,30.787) 109.097,29.041 107.711,27.655 104.245,27.655 103.183,28.717 103.183,31.65 ; 110.2,32.225 111.9,32.225 112.438,32.763 TP13.1@115.55,32.763 116.662,32.763 117,32.425 ; R85.2@117,31.1 117,32.425 ; IC32.1@124.596,33.199 123.047,33.2 121.85,33.2 121.05,32.4 C84.1@119.15,32.4 117.025,32.4 117,32.425
  L3 w0.508: v1(107.329,44.969) 107.329,44.015 107.118,43.804 107.118,32.266 109.097,30.287 v1@109.097,30.13
  other v1: 109.107,30.179
P6V0: C78.2 C79.2 IC31.8 IC31.10 L9.2 L10.1 R69.2 R72.2 | length 27.8
  L1 w0.127: L9.2@132.547,57.113 132.547,57.79 134.523,57.79 134.95,58.217 134.95,58.991 v1(134.976,59.016) ; v1(134.523,60.17) 134.594,60.098 135.229,60.098 135.241,60.087 135.241,60.055 135.556,60.055 IC31.8@135.591,60.02 ; v1@135.209,59.02 IC31.10@135.591,59.02 135.591,57.72 C78.2@135.641,57.72 ; R72.2@139.861,60.52 139.861,59.8 v1(139.891,59.77) ; v1(142.641,61.615) v1@142.671,61.585
  L1 w0.508: R69.2@142.671,61.02 v1@142.671,61.585
  L1 w0.762: L9.2@131.881,56.8 L9.2@132.176,57.095 ; L9.2@131.881,56.9 C79.2@129.2,56.9 129.2,55.629 130.1,54.729 L10.1@133.5,54.729
  L3 w0.127: v1(134.976,59.016) 134.995,59.016 135.406,58.604 138.725,58.604 v1(139.891,59.77) 140.796,59.77 v1(142.641,61.615)
  L4 w0.127: v1(134.523,60.17) 134.976,59.717 v1(134.976,59.016)
P6V0A: C80.1 C81.2 D8.1 IC32.5 IC32.8 L10.2 R53.2 R64.2 R84.2 TP12.1 | length 64.1
  L1 w0.254: v1(132.841,62.77) R64.2@133.648,62.77 ; D8.1@133.501,64.77 133.545,64.77 133.648,64.667 133.648,62.838 R64.2@133.691,62.795
  L1 w0.4: R53.2@122.137,27.5 122.15,27.513 122.953,27.513 123.837,28.397 v1(125.72,28.397) ; v1(129.493,28.397) 131.053,28.397 131.443,28.786 131.443,29.389 ; IC32.5@129.996,29.389 131.443,29.389 ; IC32.8@129.996,33.199 C81.2@132.051,33.199 ; R84.2@134.475,44.8 134.525,44.8 135.3,45.575 TP12.1@135.3,47.88 C80.1@132.744,47.88 132.483,47.88 132.058,47.455 132.058,33.192 C81.2@132.25,33 133.291,33 133.525,32.766 133.525,30.025 132.889,29.389 131.443,29.389
  L1 w0.762: C80.1@132.744,47.88 132.894,48.03 v1(132.894,49.13) ; L10.2@132.894,51.394 L10.2@133.5,52 ; 133.5,50 L10.2@133.5,51.529 135.504,51.529
  L3 w0.254: v1(132.841,62.77) 132.841,52.009 132.894,51.956 v1(132.894,49.13)
  L4 w0.4: v1(125.72,28.397) v1(129.493,28.397)
P12V0: C29.2 C57.2 IC27.8 L4.1 R47.2 R86.2 T_C1.2 T_C9.2 T_C10.2 T_D5.1 T_FL1.2 T_IC1.1 T_J1.28 T_J1.29 T_J2.28 T_J2.29 T_J4.A1 T_J4.D1 T_J4.E1 T_J4.G1 T_J4.H1 T_J4.J1 T_J4.K1 T_R3.2 T_R4.1 T_R29.2 TP2.1 | length 381.3
  L1 w0.2: T_R3.2@0.925,78.324 1.439,78.324 1.575,78.461 1.575,79.625 2.9,80.95 v1(2.9,83.052)
  L1 w0.3: IC27.8@135.191,9.792 135.341,9.642 135.341,8.809 135.525,8.625 C29.2@135.525,8.2 ; T_C1.2@151.875,10.483 v1(151.875,11.035) ; T_C1.2@152.25,10.2 T_IC1.1@153.925,10.2 154.951,10.2 155.414,9.737 155.414,7.849 155.658,7.604 156.349,7.604 156.525,7.429 156.525,6.93 T_R4.1@156.52,6.925 ; T_C1.2@152.525,10.483 v1(152.525,11.035) ; T_R29.2@168.2,15.5 168.2,16.899 172.221,20.92 T_J2.29@173.73,20.92 ; R47.2@179.977,4.219 TP2.1@179.977,5.803 ; TP2.1@180.375,5.874 v1(180.927,5.874)
  L1 w0.35: C29.2@135.525,8.2 v1(136.176,8.2)
  L1 w0.762: v2@115.444,79.081 R86.2@115.444,80.58
  L1 w1: v2(153.775,53.9) v2(154.644,54.769) 163.5,63.625 L4.1@163.5,67.925 ; L4.1@163.4,67.925 L4.1@163.5,67.925 ; L4.1@163.4,68.2 163.5,68.1 L4.1@163.5,67.925 ; T_D5.1@165.3,76.65 165.3,73.78 T_C10.2@165.33,73.75 T_C9.2@167.73,73.75 167.73,75.15 168.63,76.05 T_FL1.2@171.15,76.05 ; 171.15,69.014 T_FL1.2@171.15,76.05 ; T_FL1.2@171.15,76.1 T_FL1.2@171.15,76.05 ; 184.962,67.925 C57.2@166,67.925 L4.1@163.5,67.925
  L1 w1.5: 184.962,68.2 194.677,58.486 194.677,24.48 193.656,23.46
  L4 w0.2: v1(2.9,83.052) 3.587,83.052 4.12,83.585 10.829,83.585 19.066,91.821 86.807,91.821 94.237,84.391 112.984,84.391 114.45,82.925 114.45,80.049 v2(115.444,79.055)
  L4 w0.3: v1@151.954,11.105 160.424,19.575 172.527,19.575
  L4 w0.35: v1(136.176,8.2) 148.97,8.2 151.776,11.007 151.856,11.007 151.876,11.027 151.876,11.084 151.933,11.084 v1@151.954,11.105
  L4 w0.5: v1(180.927,5.874) 181.46,5.341 183.25,5.341 184.97,7.061 184.97,12.72 186.425,14.175
  L4 w0.508: 134.255,51.63 134.285,51.6 134.325,51.56
  L4 w0.762: v2(115.444,79.055) 115.444,76.794 114.35,75.7 114.35,58.75 115.744,57.356 122.769,57.356 128.525,51.6 134.285,51.6 151.475,51.6 v2(153.775,53.9) v2(154.644,54.769)
  L4 w1: T_J1.29@188.73,20.92 T_J1.28@191.27,23.46
P12V0A: C8A.1 C8B.1 C8C.1 C8D.1 C8E.1 C8F.1 C8G.1 C8H.1 C9A.2 C9B.2 C9C.2 C9D.2 C9E.2 C9F.2 C9G.2 C9H.2 C13A.2 C13B.2 C13C.2 C13D.2 C13E.2 C13F.2 C13G.2 C13H.2 C38.1 C39.2 C40.1 C104.2 D1A.2 D1B.2 D1C.2 D1D.2 D1E.2 D1F.2 D1G.2 D1H.2 D2A.2 D2B.2 D2C.2 D2D.2 D2E.2 D2F.2 D2G.2 D2H.2 D5.1 IC1A.8 IC1B.8 IC1C.8 IC1D.8 IC1E.8 IC1F.8 IC1G.8 IC1H.8 IC2A.8 IC2B.8 IC2C.8 IC2D.8 IC2E.8 IC2F.8 IC2G.8 IC2H.8 IC21.1 IC35.8 R48.2 R51.2 TP7.1 | length 172.1
  L1 w0.203: C8H.1@73.829,13.658 74.629,13.658 75.132,14.161 76.864,14.161 76.975,14.05 C9H.2@76.975,13.55 76.775,13.35 IC2H.8@76.775,11.967 ; C8G.1@73.829,23.658 74.629,23.658 75.132,24.161 76.864,24.161 76.975,24.05 C9G.2@76.975,23.55 ; C8F.1@73.829,33.658 74.629,33.658 75.132,34.161 76.864,34.161 76.975,34.05 C9F.2@76.975,33.55 ; C8E.1@73.829,43.658 74.629,43.658 75.132,44.161 76.864,44.161 76.975,44.05 C9E.2@76.975,43.55 ; C8D.1@73.829,53.658 74.629,53.658 75.132,54.161 76.864,54.161 76.975,54.05 C9D.2@76.975,53.55 ; C8B.1@73.829,73.658 74.629,73.658 75.132,74.161 76.864,74.161 76.975,74.05 C9B.2@76.975,73.55 ; C8A.1@73.829,83.658 74.629,83.658 75.132,84.161 76.864,84.161 76.975,84.05 C9A.2@76.975,83.55 ; C8C.1@73.841,63.614 74.641,63.614 75.139,64.111 ; 75.132,64.111 75.139,64.111 ; 75.145,64.117 75.139,64.111 ; IC2G.8@76.775,21.967 76.775,23.258 C9G.2@76.965,23.448 ; IC2F.8@76.775,31.967 76.775,33.258 C9F.2@76.965,33.448 ; IC2E.8@76.775,41.967 76.775,43.258 C9E.2@76.965,43.448 ; IC2D.8@76.775,51.967 76.775,53.258 C9D.2@76.965,53.448 ; IC2B.8@76.775,71.967 76.775,73.258 C9B.2@76.965,73.448 ; IC2A.8@76.775,81.967 76.775,83.258 C9A.2@76.965,83.448 ; IC2C.8@76.788,61.923 76.788,63.214 C9C.2@76.978,63.404 ; C9C.2@76.975,63.5 76.975,64 76.864,64.111 75.139,64.111 ; v1(89.144,14.255) 89.194,14.205 C13H.2@89.194,13.43 89.644,12.98 89.644,12.755 90.469,11.93 IC1H.8@90.469,11.309 ; v1(89.144,24.255) 89.194,24.205 C13G.2@89.194,23.43 89.644,22.98 89.644,22.755 90.469,21.93 IC1G.8@90.469,21.309 ; v1(89.144,34.255) 89.194,34.205 C13F.2@89.194,33.43 89.644,32.98 89.644,32.755 90.469,31.93 IC1F.8@90.469,31.309 ; v1(89.144,44.255) 89.194,44.205 C13E.2@89.194,43.43 89.644,42.98 89.644,42.755 90.469,41.93 IC1E.8@90.469,41.309 ; v1(89.144,54.255) 89.194,54.205 C13D.2@89.194,53.43 89.644,52.98 89.644,52.755 90.469,51.93 IC1D.8@90.469,51.309 ; v1(89.144,74.255) 89.194,74.205 C13B.2@89.194,73.43 89.644,72.98 89.644,72.755 90.469,71.93 IC1B.8@90.469,71.309 ; v1(89.144,84.255) 89.194,84.205 C13A.2@89.194,83.43 89.644,82.98 89.644,82.755 90.469,81.93 IC1A.8@90.469,81.309 ; v1(89.157,64.211) 89.207,64.161 C13C.2@89.207,63.386 89.657,62.936 89.657,62.711 90.482,61.886 IC1C.8@90.482,61.265 ; IC35.8@106.575,58.725 106.883,58.725 107.006,58.848 C104.2@107.006,59.995 ; TP7.1@115.55,51.025 116.525,51.025 116.7,51.2 ; 116.55,48.362 116.55,49.947 116.993,50.39 ; R48.2@116.7,52.76 116.7,51.2 ; R51.2@117.443,47.469 R51.2@117.493,47.469 117.793,47.169 C40.1@117.793,46.298 ; C38.1@117.902,50.39 118.425,50.913 C38.1@118.425,50.922 ; C38.1@118.948,50.398 C38.1@118.425,50.922 ; IC21.1@120.3,50.306 120.498,50.108 IC21.1@120.834,50.108 ; 116.7,51.2 116.875,51.025 C38.1@118.425,51.025 C38.1@118.425,50.922
  L1 w0.35: v1(77.394,85.7) D5.1@77.394,86.605 ; D5.1@77.394,87.655 v1(77.394,88.56) ; v1(78.644,85.7) D5.1@78.644,86.605 ; D5.1@78.644,87.655 v1(78.644,88.56)
  L1 w0.4: C104.2@107.006,59.995 107.115,60.104 109.284,60.104 112.954,56.435 112.954,55.07 ; 116.993,50.39 C38.1@117.902,50.39 ; C38.1@118.948,50.398 119.236,50.398 119.526,50.108 IC21.1@120.498,50.108 ; IC21.1@120.3,50.306 C39.2@120.3,51.425
  L1 w0.508: D1H.2@69.983,12.568 69.983,12.338 70.827,11.494 v1(71.957,11.494) ; D1G.2@69.983,22.568 69.983,22.338 70.827,21.494 v1(71.957,21.494) ; D1F.2@69.983,32.568 69.983,32.338 70.827,31.494 v1(71.957,31.494) ; D1E.2@69.983,42.568 69.983,42.338 70.827,41.494 v1(71.957,41.494) ; D1D.2@69.983,52.568 69.983,52.338 70.827,51.494 v1(71.957,51.494) ; D1B.2@69.983,72.568 69.983,72.338 70.827,71.494 v1(71.957,71.494) ; D1A.2@69.983,82.568 69.983,82.338 70.827,81.494 v1(71.957,81.494) ; D1C.2@69.996,62.524 69.996,62.294 70.839,61.45 v1(71.97,61.45) ; v1@70.928,6.313 v1@70.946,6.331 ; v1@70.928,16.313 v1@70.946,16.331 ; v1@70.928,26.313 v1@70.946,26.331 ; v1@70.928,36.313 v1@70.946,36.331 ; v1@70.928,46.313 v1@70.946,46.331 ; v1@70.928,66.313 v1@70.946,66.331 ; v1@70.928,76.313 v1@70.946,76.331 ; v1@70.94,56.269 v1@70.959,56.288 ; v1@70.946,6.322 D2H.2@71.838,6.322 ; v1@70.946,16.322 D2G.2@71.838,16.322 ; v1@70.946,26.322 D2F.2@71.838,26.322 ; v1@70.946,36.322 D2E.2@71.838,36.322 ; v1@70.946,46.322 D2D.2@71.838,46.322 ; v1@70.946,66.322 D2B.2@71.838,66.322 ; v1@70.946,76.322 D2A.2@71.838,76.322 ; v1@70.959,56.278 D2C.2@71.85,56.278 ; v1(72.635,13.653) 72.64,13.658 C8H.1@73.829,13.658 ; v1(72.635,23.653) 72.64,23.658 C8G.1@73.829,23.658 ; v1(72.635,33.653) 72.64,33.658 C8F.1@73.829,33.658 ; v1(72.635,43.653) 72.64,43.658 C8E.1@73.829,43.658 ; v1(72.635,53.653) 72.64,53.658 C8D.1@73.829,53.658 ; v1(72.635,73.653) 72.64,73.658 C8B.1@73.829,73.658 ; v1(72.635,83.653) 72.64,83.658 C8A.1@73.829,83.658 ; v1(72.648,63.609) 72.652,63.614 C8C.1@73.841,63.614
  L4 w1.27: 103.149,81.988 103.232,82.071 109.079,82.071 111.118,80.032 111.118,57.307 113.4,55.025
  other v1: 70.928,6.322 70.928,16.322 70.928,26.322 70.928,36.322 70.928,46.322 70.94,56.278 70.928,66.322 70.928,76.322
  other v2: 114.15,53.6 113.275,54.438 114.15,55.275
P13V0: C37.2 C43.2 C47.1 C51.2 IC21.8 IC22.1 IC22.3 IC23.1 L3.2 R41.2 R46.2 TP1.1 | length 106.4
  L1 w0.203: IC22.3@124.544,17.115 IC22.3@124.547,17.111
  L1 w0.25: IC22.1@124.594,15.169 IC22.1@124.544,15.169 123.769,15.169 123.214,15.723 123.214,16.614 123.669,17.069 IC22.3@124.544,17.069 IC22.3@124.594,17.069
  L1 w0.5: TP1.1@115.55,71.9 115.55,73.38 ; L3.2@118,73.6 R46.2@118,76.21 ; 124.194,51.425 124.219,51.4 127.875,51.4 128.175,51.1 128.175,50.213 C37.2@128.179,50.209 128.078,50.108 IC21.8@126.234,50.108 ; IC23.1@124.594,11.669 124.619,11.694 125.276,11.694 125.544,11.962 125.544,14.434 ; IC22.1@124.594,15.169 125.294,15.169 125.544,14.919 125.544,14.434 ; C47.1@127.375,14.8 127.009,14.434 125.544,14.434
  L1 w0.762: 113.944,71.671 113.944,73.4 R41.2@113.944,80.58 ; 113.948,71.771 113.948,70.2 113.948,62.649 116.51,60.088 119.737,60.088 124.194,55.631 124.194,51.425 124.194,46.094 128.224,42.064 128.224,20.224 126.475,18.475 C43.2@126.475,16.8 126.569,16.706 126.569,15.881 127.375,15.075 C47.1@127.375,14.8 ; 113.994,70.2 C51.2@119.319,70.2 ; 114.058,73.4 115.55,73.4 L3.2@117.8,73.4
  L1 w1.016: L3.2@117.8,73.4 L3.2@118,73.6
P13V0S: C48.2 IC25.7 L2.1 R56.2 | length 24.4
  L1 w0.203: 125.194,70.58 R56.2@126.944,70.58
  L1 w1.27: L2.1@121.944,82.73 L2.1@122.044,82.73 ; C48.2@122.044,84.73 L2.1@122.044,82.73 ; IC25.7@129.294,70.245 128.101,69.052 126.022,69.052 125.194,69.88 125.194,70.58 125.194,82.13 124.594,82.73 L2.1@122.044,82.73
PGIA-CS: IC11.5 IC19.12 IC20.12 | length 179.7
  L1 w0.127: v1(104.797,76.9) IC19.12@105.899,76.9 ; IC20.12@105.899,8.437 v1(107.001,8.437)
  L1 w0.152: v1(161.075,12.875) 161.075,15.756 172.315,26.996 178.554,26.996 180.125,25.425 181.028,25.425 181.227,25.227 IC11.5@181.227,25.02
  L4 w0.152: v1(104.797,76.9) 107.05,76.9 107.5,76.45 107.5,75.801 107.324,75.625 107.01,75.625 106.537,75.152 106.537,74.613 107.063,74.086 107.063,62.773 105.575,61.285 105.575,59.152 105.89,58.837 105.89,45.89 105.25,45.25 105.25,44.7 105.55,44.4 105.55,41.5 104.661,40.611 104.661,34.214 105.314,33.561 105.314,29.136 105.442,29.008 105.442,28.358 106.999,26.801 106.999,22.066 109.333,19.732 113.15,19.732 114.77,18.113 114.77,15.355 109.904,10.489 106.964,10.489 106.375,9.9 106.375,9.062 v1(107.001,8.437) 107.812,7.625 109.425,7.625 111.22,5.83 123.02,5.83 129.32,-0.47 141.974,-0.47 154.329,11.885 155.474,11.885 157.014,13.425 160.525,13.425 v1(161.075,12.875)
PGIA-MISO: IC10.5 IC20.9 | length 95.8
  L1 w0.152: IC20.9@105.899,6.487 IC20.9@105.9,6.486 ; IC20.9@105.9,6.487 108.317,6.487 v1@108.318,6.486 ; v1(160.15,12.875) 160.15,15.731 171.969,27.55 179.441,27.55 181.227,29.336 IC10.5@181.227,30.27
  L4 w0.152: v1(108.318,6.487) 109.284,6.487 110.845,4.925 122.645,4.925 128.945,-1.375 142.349,-1.375 150.099,6.375 153.35,6.375 153.73,6.755 153.73,9.922 154.788,10.98 156.809,10.98 158.704,12.875 v1(160.15,12.875)
PGIA-MOSI: IC9.5 IC19.14 | length 188.9
  L1 w0.127: v1(104.797,78.2) IC19.14@105.899,78.2
  L1 w0.152: v1(159.325,12.275) 159.325,15.981 172.875,29.531 177.427,29.531 180.347,32.451 180.347,33.685 181.227,34.565 IC9.5@181.227,35.52
  L4 w0.152: v1(104.797,78.2) 104.245,77.648 104.245,75.564 106.1,73.71 106.1,65.323 106.311,65.112 106.311,64.611 106.15,64.45 106.15,63.268 104.611,61.729 104.611,58.464 104.875,58.2 104.875,45.9 104.44,45.465 104.44,41.94 103.3,40.8 102.85,40.8 102.475,40.425 102.475,34.405 102.83,34.049 103.301,34.049 104.394,32.956 104.394,29.362 104.152,29.119 104.152,27.968 106.058,26.062 106.058,21.677 108.874,18.86 112.432,18.86 113.645,17.647 113.645,15.821 109.298,11.474 106.534,11.474 104.063,9.003 104.063,8.523 104.536,8.05 106.043,8.05 108.086,6.007 109.162,6.007 110.669,4.5 122.469,4.5 128.769,-1.8 142.525,-1.8 150.275,5.95 153.526,5.95 154.155,6.579 154.155,9.746 154.964,10.555 157.605,10.555 v1(159.325,12.275)
PGIA-SCK: IC8.5 IC19.11 IC20.11 | length 188.6
  L1 w0.127: IC19.11@105.899,76.25 v1(107.001,76.25)
  L1 w0.152: v1(157.875,12.725) 157.875,15.556 172.353,30.034 176.792,30.034 179.542,32.784 179.542,38.067 181.227,39.752 IC8.5@181.227,40.77
  L1 w0.203: v1(104.55,8.825) 104.55,8.125 104.888,7.787 IC20.11@105.899,7.787
  L4 w0.152: v1(107.001,76.25) 106.091,75.34 106.091,74.432 106.604,73.919 106.604,63.116 105.09,61.602 105.09,58.776 105.351,58.515 105.351,45.908 104.85,45.406 104.85,44.446 104.992,44.304 104.992,41.792 103.575,40.375 103.575,34.45 104.823,33.202 104.823,29.145 104.499,28.821 104.499,28.297 106.536,26.26 106.536,21.875 109.141,19.27 112.755,19.27 114.164,17.862 114.164,15.606 109.578,11.021 106.746,11.021 v1(104.55,8.825) 104.85,8.525 106.216,8.525 107.741,7 109.427,7 111.038,5.39 122.838,5.39 129.138,-0.91 142.157,-0.91 154.512,11.445 155.62,11.445 156.9,12.725 v1(157.875,12.725)
PGOOD: R157.2 T_R5.1 T_T1.1 | length 240.2
  L1 w0.15: T_T1.1@4.75,77.857 3.974,77.857 3.9,77.931 3.299,78.532 3.299,80.114 3.819,80.634 4.909,80.634 5.454,81.179 v1(5.454,83.052)
  L1 w0.152: T_R5.1@128.58,0.9 124.411,0.9 123.237,2.075 123.237,5.476 124.736,6.975 127.3,6.975 129.464,9.139 v1(129.464,16.801) ; v1(130.319,18.688) 130.319,24.694 134.6,28.975 134.6,41.514 ; R157.2@133.2,43.5 133.205,43.495 133.205,42.909 134.6,41.514 ; v1(137.075,50.825) 137.075,42.4 136.189,41.514 134.6,41.514
  L4 w0.15: v1(5.454,83.052) 6.077,83.052 6.204,83.179 10.868,83.179 19.196,91.507 86.677,91.507 94.107,84.077 112.854,84.077 114.136,82.795 114.136,76.952 113.594,76.41 113.594,58.331 115.465,56.46 122.571,56.46 128.206,50.825 v1(137.075,50.825) v1@137.121,50.825
  L4 w0.152: v1(129.464,16.801) 129.464,17.314 130.319,18.169 v1(130.319,18.688)